# Altium PCB Main-PCB-v1.0-1.PcbDoc (part 4 of 5)
Units mil, origin at the board's own origin, x right, y up, seen from the top; angles counter-clockwise.
Board outline 8760 x 2778 mil, 2 copper layers (Top Layer, Bottom Layer), stack 57 mil thick; 252 components, 204 nets, 813 pads, 473 vias.
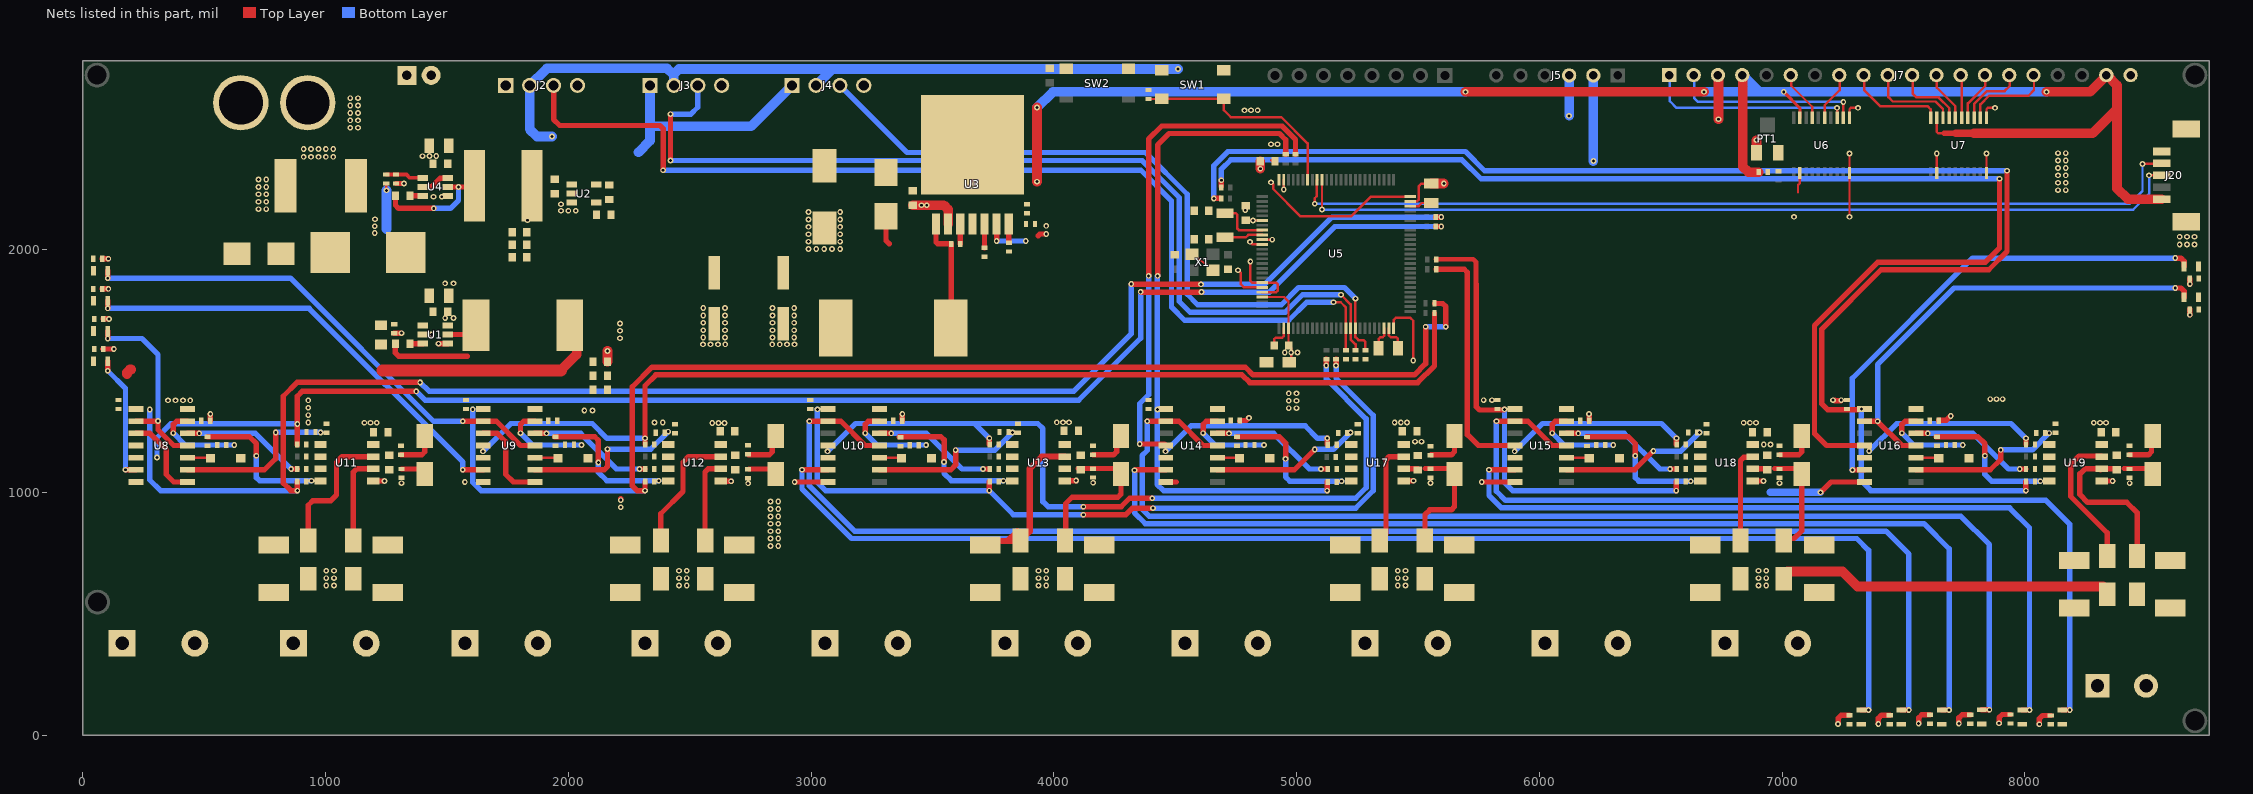
[diagram p2: the nets of this part, all layers, seen from the top]

## Via types
v1: diameter 23.62, hole 11.81, Top Layer to Bottom Layer, 473 vias

## Nets (pads, with @x,y where several pads share a name; then routed paths per layer and width w, separated by ;. In a path a pad name is that pad's centre, name@x,y a point inside that pad or via, vN(x,y) a via of type N, cw(c..) or ccw(c..) an arc to the next point about the centre after c; other vN are vias at no path point) (continued)
NetLED9_2: LED9.2 R62.2
NetLED10_1: LED10.1 U14.2 U14.11 | length 4962.8
  Top Layer w22: v1(4385.14,1293) U14.2@4461.5,1293 4515.3,1293 4615.3,1193 U14.11@4674.09,1193 ; LED10.1@7823.41,104.53 v1@7854.03,104.53
  Bottom Layer w22: v1(4385.14,1293) 4385.14,1172.14 4364,1151 4364,931 4393.56,901.44 7737.56,901.44 7854.05,784.95 v1(7854.05,104.51)
NetLED10_2: LED10.2 R63.2
NetLED11_1: LED11.1 U15.2 U15.11 | length 3832.9
  Top Layer w22: v1(5823.44,1293) U15.2@5899.8,1293 5953.6,1293 6053.6,1193 U15.11@6112.39,1193 ; LED11.1@8154.95,103.53 v1(8185.58,103.51)
  Bottom Layer w22: v1(5823.44,1293) 5823.44,1004.56 5861,967 8087,967 8185.58,868.42 v1(8185.58,103.51)
NetLED11_2: LED11.2 R64.2
NetLED12_1: LED12.1 U16.2 U16.11 | length 1911.8
  Top Layer w22: U16.2@7339.8,1293 v1(7394,1293) 7394,1292.6 7493.6,1193 U16.11@7552.39,1193 ; v1(8620,1842) 8620.31,1841.69 8643.59,1841.69 8656.47,1828.8 LED12.1@8656.47,1803.68
  Bottom Layer w22: v1(7394,1293) 7394,1527 7709,1842 v1(8620,1842)
NetLED12_2: LED12.2 R65.2
NetPT1_1: PT1.1 SB1.2 SB2.2
NetR1_1: R1.1 R2.2 U1.4 | length 4.5
  Top Layer w22: R1.1@1229.2,1683 R1.1@1232.4,1686.2
NetR3_1: R3.1 R4.2 U4.4 | length 156.7
  Top Layer w15: R3.1@1250.2,2309.5 R4.2@1291.2,2309.5 1333.5,2309.5 1347.6,2295.4 U4.4@1401.02,2295.4
NetR5_2: R5.2 R7.2 U3.6 | length 190
  Top Layer w22: v1(3764.8,2035.2) U3.6@3764.8,2105.22
  Bottom Layer w22: v1(3764.8,2035.2) v1(3884.8,2035.2)
NetR6_2: R6.2 U3.5 | length 97.7
  Top Layer w22: R6.2@3714.8,2007.5 U3.5@3714.8,2105.22
NetR36_1: R36.1 SB9.1 U11.4 | length 585.3
  Top Layer w22: R36.1@513.8,1229 687,1229 715,1201 v1(715,1151)
  Bottom Layer w22: v1(715,1151) 715,1060.89 727.89,1048 v1(942,1048)
NetR37_1: R37.1 SB10.1 U12.4 | length 580.3
  Top Layer w22: R37.1@1944.39,1229 2109.11,1229 2124,1214.11 v1(2124,1123)
  Bottom Layer w22: v1(2124,1123) 2124,1082.49 2158.49,1048 v1(2372.6,1048)
NetR38_1: R38.1 SB11.1 U13.4 | length 584.4
  Top Layer w22: R38.1@3364.09,1229 3535.42,1229 3548.31,1216.11 3548.31,1125.31 v1(3548,1125)
  Bottom Layer w22: v1(3548,1125) 3548,1078.19 3578.19,1048 v1(3792.3,1048)
NetR39_1: R39.1 R40.1 U8.9 | length 675.3
  Top Layer w22: U8.9@431.8,1093 749,1093 795,1139 v1(795,1247)
  Bottom Layer w22: v1(795,1247) v1(980,1247)
NetR40_2: R40.2 SB6.1 U11.1
NetR41_1: R41.1 R42.1 U9.9 | length 656.2
  Top Layer w22: U9.9@1862.39,1093 2149.11,1093 2162,1105.89 v1(2162,1178)
  Bottom Layer w22: v1(2162,1178) 2339.8,1178 2411.27,1249.47 v1@2411.58,1249.47
  other v1: 2411.8,1250
NetR42_2: R42.2 SB7.1 U12.1
NetR43_1: R43.1 R44.1 U10.9 | length 647.7
  Top Layer w22: U10.9@3282.09,1093 3576,1093 3596,1113 v1(3596,1174)
  Bottom Layer w22: v1(3596,1174) 3757.3,1174 v1(3830.3,1247)
NetR44_2: R44.2 SB8.1 U13.1
NetR45_1: R45.1 U8.12 | length 513.4
  Top Layer w22: U8.12@431.8,1243 v1(480,1243) ; v1(858.59,1096) R45.1@884.3,1096
  Bottom Layer w22: v1(480,1243) 711.59,1243 v1(858.59,1096)
NetR45_2: R45.2 SB3.2 U11.2 U11.3
NetR46_1: R46.1 U9.12 | length 514.8
  Top Layer w22: U9.12@1862.39,1243 v1(1910.6,1243) ; v1(2293.81,1096) R46.1@2316.3,1096
  Bottom Layer w22: v1(1910.6,1243) 2051,1243 2198,1096 v1(2293.81,1096)
NetR46_2: R46.2 SB4.2 U12.2 U12.3
NetR47_1: R47.1 U10.12 | length 513.4
  Top Layer w22: U10.12@3282.09,1243 v1(3330.3,1243) ; v1(3708.89,1096) R47.1@3734.59,1096
  Bottom Layer w22: v1(3330.3,1243) 3475,1243 3622,1096 v1(3708.89,1096)
NetR47_2: R47.2 SB5.2 U13.2 U13.3
NetR69_1: R69.1 SB18.1 U17.4 | length 587.8
  Top Layer w22: R69.1@4756.09,1229 4929.3,1229 4955,1203.3 v1(4955,1138)
  Bottom Layer w22: v1(4955,1138) 4955,1063.19 4972.19,1046 v1(5186,1046)
NetR70_1: R70.1 SB19.1 U18.4 | length 587.8
  Top Layer w22: R70.1@6194.39,1229 6367.6,1229 6395.6,1201 v1(6395.6,1151)
  Bottom Layer w22: v1(6395.6,1151) 6395.6,1060.89 6410.49,1046 v1(6624.3,1046)
NetR71_1: R71.1 SB20.1 U19.4 | length 580.5
  Top Layer w22: R71.1@7634.39,1229 7807.6,1229 7835.6,1201 v1(7835.6,1151)
  Bottom Layer w22: v1(7835.6,1151) 7835.6,1073.4 7863,1046 v1(8064.3,1046)
NetR72_1: R72.1 R73.1 U14.9 | length 612
  Top Layer w22: U14.9@4674.09,1093 4991.3,1093 v1(5075.3,1177)
  Bottom Layer w22: v1(5075.3,1177) 5152.3,1177 v1(5222.3,1247)
NetR73_2: R73.2 SB15.1 U17.1
NetR74_1: R74.1 R75.1 U15.9 | length 611.6
  Top Layer w22: U15.9@6112.39,1093 6393,1093 v1@6469.69,1169.69
  Bottom Layer w22: v1(6470,1170) 6583.6,1170 v1(6660.6,1247)
NetR75_2: R75.2 SB16.1 U18.1
NetR76_1: R76.1 R77.1 U16.9 | length 634.6
  Top Layer w22: U16.9@7552.39,1093 7858,1093 7901,1136 v1(7901,1175)
  Bottom Layer w22: v1(7901,1175) 8032,1175 8100.69,1243.69 v1@8100.69,1244.75
  other v1: 8101,1244
NetR77_2: R77.2 SB17.1 U19.1
NetR78_1: R78.1 U14.12 | length 513.4
  Top Layer w22: U14.12@4674.09,1243 v1(4722.3,1243) ; v1(5100.89,1096) R78.1@5126.59,1096
  Bottom Layer w22: v1(4722.3,1243) 4906,1243 5053,1096 v1(5100.89,1096)
NetR78_2: R78.2 SB12.2 U17.2 U17.3
NetR79_1: R79.1 U15.12 | length 513.4
  Top Layer w22: U15.12@6112.39,1243 v1(6160.6,1243) ; v1(6539.19,1096) R79.1@6564.89,1096
  Bottom Layer w22: v1(6160.6,1243) 6350,1243 6497,1096 v1(6539.19,1096)
NetR79_2: R79.2 SB13.2 U18.2 U18.3
NetR80_1: R80.1 U16.12 | length 513.4
  Top Layer w22: U16.12@7552.39,1243 v1(7600.6,1243) ; v1(7979.19,1096) R80.1@8004.89,1096
  Bottom Layer w22: v1(7600.6,1243) 7786,1243 7933,1096 v1(7979.19,1096)
NetR80_2: R80.2 SB14.2 U19.2 U19.3
NetU8_3: U8.3 U8.8 | length 355.2
  Top Layer w22: U8.3@219.2,1243 277,1243 344,1176 344,1074 375,1043 U8.8@431.8,1043
NetU9_3: U9.3 U9.8 | length 373.9
  Top Layer w22: U9.3@1649.8,1243 1707.6,1243 1742.6,1208 1742.6,1074 1773.6,1043 U9.8@1862.39,1043